# Altium PCB A313_6.PcbDoc (part 2 of 3)
Units mm, origin at the board's own origin, x right, y up, seen from the top; angles counter-clockwise.
Board outline 230.01 x 157.01 mm, 2 copper layers (Top Layer, Bottom Layer); 234 components, 195 nets, 1068 pads, 566 vias.
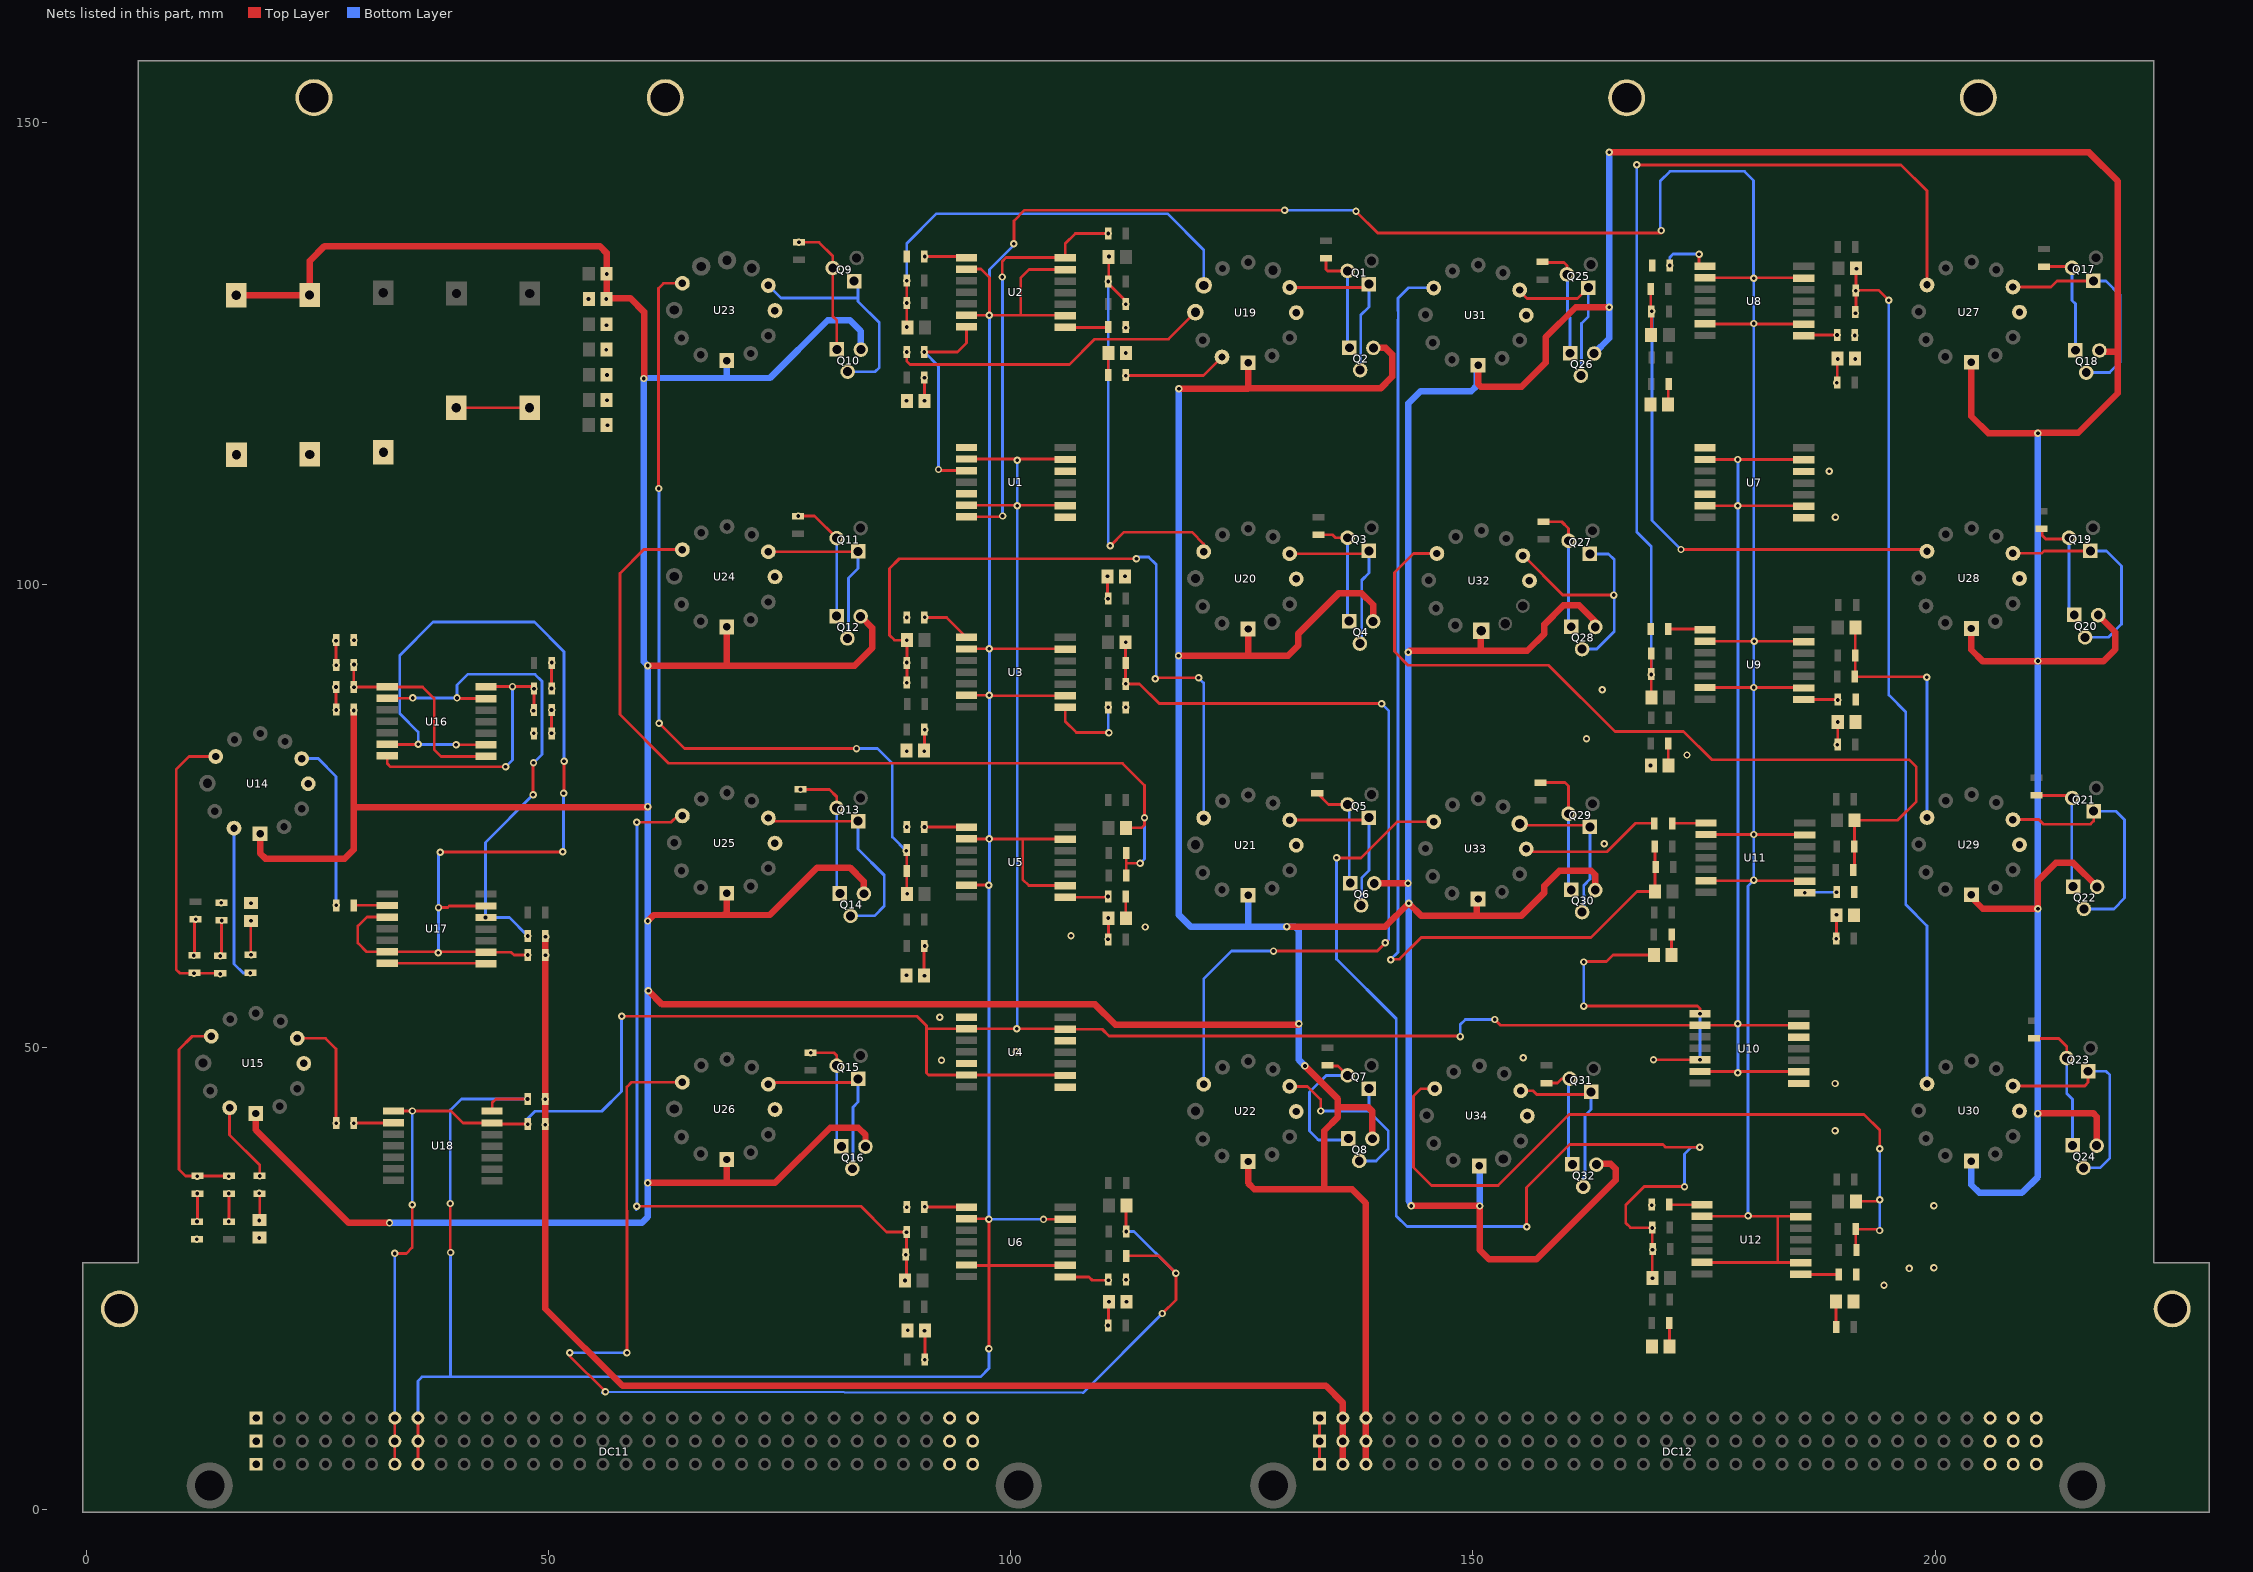
[diagram p2: the nets of this part, all layers, seen from the top]

## Via types
v1: diameter 0.8, hole 0.4, Top Layer to Bottom Layer, 566 vias

## Nets (pads, with @x,y where several pads share a name; then routed paths per layer and width w, separated by ;. In a path a pad name is that pad's centre, name@x,y a point inside that pad or via, vN(x,y) a via of type N, cw(c..) or ccw(c..) an arc to the next point about the centre after c; other vN are vias at no path point) (continued)
-12,6V: C40.2 C41.2 C42.2 C43.1 DC12.A3 DC12.B3 DC12.C3 pad.2 pad.5 Q2.3 Q4.3 Q6.3 Q8.3 Q10.3 Q12.3 Q14.3 Q16.3 Q18.3 Q20.3 Q22.3 Q24.3 Q26.3 Q28.3 Q30.3 Q32.3 R118.1 U14.1 U15.1 U19.1 U20.1 U21.1 U22.1 U23.1 U24.1 U25.1 U26.1 U27.1 U28.1 U29.1 U30.1 U31.1 U32.1 U33.1 U34.1 | length 1175.1
  Top Layer w0.3: Q18.3@217.75,125.35 219.6,125.35 219.725,125.225
  Top Layer w0.7: pad.2@16.25,131.325 pad.5@24.157,131.325 ; U15.1@18.35,42.835 18.35,41.05 28.4,31 v1(32.825,31) ; U14.1@18.825,73.085 18.825,70.975 19.4,70.4 27.975,70.4 28.949,71.374 28.949,75.975 ; pad.5@24.182,131.35 24.182,135.032 25.8,136.65 55.55,136.65 56.3,135.9 56.3,131.025 58.85,131.025 60.35,129.525 v1@60.35,122.325 ; R118.1@28.949,86.507 28.949,75.975 ; v1(60.75,35.325) 69.35,35.325 ; v1(60.75,63.65) 61.4,64.3 69,64.3 ; v1(60.75,91.275) 69.4,91.275 ; v1@60.8,75.975 28.949,75.975 ; v1(60.825,56.1) 62.3,54.625 109.125,54.625 111.3,52.45 v1@131.175,52.45 ; U26.1@69.3,37.86 69.3,35.375 69.35,35.325 ; U25.1@69.3,66.66 69.3,64.6 69,64.3 ; U24.1@69.3,95.46 69.3,91.375 69.4,91.275 ; Q12.3@83.775,96.6 85.025,95.35 85.025,93.175 83.125,91.275 69.4,91.275 ; Q14.3@84.125,66.6 84.125,67.925 82.625,69.425 79.075,69.425 73.95,64.3 69,64.3 ; Q16.3@84.3,39.25 84.3,40.526 83.526,41.3 80.476,41.3 74.501,35.325 69.35,35.325 ; v1(118.15,92.35) 125.675,92.35 ; v1(118.2,121.225) 125.625,121.225 125.65,121.25 ; U22.1@125.675,37.635 125.675,35.325 126.35,34.65 132.5,34.65 133.925,34.632 133.925,40.975 135.4,42.45 135.4,43.525 ; U20.1@125.675,95.235 125.675,92.35 ; U19.1@125.675,124.035 125.675,121.275 125.65,121.25 ; v1(129.85,63.05) 140.525,63.05 v1(143.05,65.575) 144.426,64.199 150.425,64.199 ; v1(131.825,47.975) 135.4,44.4 135.4,43.525 ; 133.927,34.632 136.918,34.632 138.4,33.15 DC12.C3@138.4,10.35 ; DC12.A3@138.4,4.9 DC12.C3@138.4,9.9 ; Q8.3@139.125,40.1 139.125,43.05 138.65,43.525 135.4,43.525 ; Q4.3@139.2,96.05 139.2,97.85 137.975,99.075 135.455,99.075 131.125,94.745 131.125,93.475 130,92.35 125.675,92.35 ; Q2.3@139.225,125.625 140.55,125.625 141.25,124.925 141.25,122.5 140,121.25 125.65,121.25 ; Q6.3@139.325,67.725 v1(142.975,67.725) ; v1(143,92.725) 143.15,92.875 150.85,92.875 ; v1(143.312,32.837) 150.625,32.837 v1@150.625,32.875 ; U33.1@150.425,66.235 150.425,64.199 ; U31.1@150.55,123.76 150.55,121.75 150.85,121.45 155.275,121.45 157.85,124.025 157.85,126.775 161.1,130.025 v1(164.75,130.025) ; v1(150.725,32.825) 150.713,32.837 150.713,28.087 151.75,27.05 156.85,27.05 165.425,35.625 165.425,36.85 164.9,37.375 163.425,37.375 Q32.3@163.35,37.3 ; U32.1@150.85,94.985 150.85,92.875 ; Q30.3@163.225,67 163.225,68.656 162.781,69.1 159.35,69.1 157.725,67.475 157.725,66.725 155.199,64.199 150.425,64.199 ; Q28.3@163.225,95.45 163.225,96.05 161.5,97.775 159.775,97.775 157.725,95.725 157.725,94.725 155.875,92.875 150.85,92.875 ; v1@164.9,146.775 216.625,146.775 219.725,143.675 219.725,125.225 ; U29.1@203.9,66.485 203.9,66.214 205.144,64.969 v1(211.1,64.969) 211.1,68 213.025,69.925 214.925,69.925 Q22.3@217.5,67.35 ; U28.1@203.9,95.285 203.9,92.975 205.15,91.725 210.8,91.725 218.175,91.725 219.475,93.025 219.475,94.875 Q20.3@217.625,96.725 ; U27.1@203.9,124.085 203.9,118.25 205.75,116.4 v1(211.1,116.4) ; v1(211.075,42.825) 211.125,42.875 217.06,42.875 217.45,42.485 Q24.3@217.45,39.35 ; v1@211.1,116.45 215.45,116.45 219.725,120.725 219.725,125.225 ; Q18.3@217.75,125.35 217.875,125.225 219.725,125.225
  Bottom Layer w0.3: U34.1@150.675,37.11 U34.1@150.675,37.16 U34.1@150.725,37.11
  Bottom Layer w0.7: v1(32.825,31) 60.1,31 60.75,31.65 v1(60.75,35.325) v1(60.75,63.65) v1(60.75,76.025) v1(60.75,91.275) 60.317,91.708 60.317,122.325 60.317,122.355 60.337,122.375 69.3,122.375 ; U23.1@69.3,124.26 69.3,122.375 ; Q10.3@83.8,125.45 83.8,127.45 82.625,128.625 80.215,128.625 73.965,122.375 69.3,122.375 ; v1(118.2,121.225) 118.2,92.35 118.2,64.3 119.45,63.05 v1(129.85,63.05) 130.725,63.05 131.175,62.6 v1(131.175,52.55) 131.175,48.625 v1(131.825,47.975) ; 125.675,63.4 U21.1@125.675,66.435 ; v1(143.312,32.837) 143.05,33.375 v1(143.05,65.575) 143.1,65.625 143,65.725 v1(143,92.725) 143,119.625 144.325,120.95 149.8,120.95 150.425,121.575 U31.1@150.425,123.785 ; U34.1@150.425,37.36 U34.1@150.675,37.11 ; v1(150.725,32.825) U34.1@150.725,37.11 ; Q26.3@163.1,125.025 164.75,126.675 v1(164.75,130.025) v1(164.75,146.8) ; U30.1@203.9,37.685 203.9,35.125 204.775,34.25 209.375,34.25 211.1,35.975 211.075,37 211.08,42.825 v1(211.1,64.969) ; v1(211.1,116.4) v1(211.1,91.775) v1@211.1,65.225 ; v1(211.1,64.969) v1@211.1,65.225 ; v1(211.1,64.969) v1@211.1,65.225
  other v1: 28.95,86.425 60.325,122.325 56.25,130.925 56.325,133.625
-23V: DC12.A2 DC12.B2 DC12.C2 R32.1 R33.1 R35.1 R36.1 | length 137.4
  Top Layer w0.7: R33.1@49.674,62.032 R32.1@49.674,59.957 R36.1@49.674,44.407 R35.1@49.674,41.682 49.674,21.726 58.025,13.375 134.1,13.375 135.9,11.575 DC12.A2@135.9,4.9
  other v1: 49.675,41.625 49.675,44.375 49.7,59.95 49.7,61.95
A: C2.1 C3.2 C4.2 C6.1 C8.1 C10.1 C12.1 C14.1 C16.1 C18.1 C20.1 C22.1 C24.1 C26.1 C28.1 C30.1 C32.1 C34.1 C35.1 C36.1 C37.1 C38.1 C39.2 C40.1 C42.1 C43.2 C44.2 C45.2 C46.2 DC11.A1 DC11.A31 DC11.A32 DC11.B1 DC11.B31 DC11.B32 DC11.C1 DC11.C31 DC11.C32 DC12.A1 DC12.A30 DC12.A31 DC12.A32 DC12.B1 DC12.B30 DC12.B31 DC12.B32 DC12.C1 DC12.C30 DC12.C31 DC12.C32 pad.0 pad.3 pad.4 pad.7 pad.9 pad.10 R4.1 R5.1 R6.1 R7.1 R8.1 R9.1 R10.1 R11.1 R12.1 R13.1 R14.1 R15.1 R16.1 R17.1 R18.1 R19.1 R117.1 R120.1 R121.2 R122.1 U1.1 U1.5 U1.8 U1.12 U4.1 U4.5 U4.8 U4.12 U7.1 U7.5 U7.8 U7.12 U10.1 U10.5 U10.8 U10.12 U14.4 U15.4 U17.7 U17.8 U19.4 U20.4 U21.4 U22.4 U23.4 U24.4 U25.4 U26.4 U27.4 U28.4 U29.4 U30.4 U31.4 U32.4 U33.4 U34.4 | length 77.2
  Top Layer w0.3: U17.7@32.575,59.076 U17.8@43.2,59.076 ; pad.9@40.043,119.15 pad.10@47.975,119.15 ; v1(88.725,119.9) C12.1@88.775,119.9 ; R9.1@112.451,66.307 112.451,63.974 C8.1@112.475,63.95 ; DC12.A1@133.4,4.9 DC12.C1@133.4,9.9 ; U33.4@155.757,71.446 156.052,71.15 164.525,71.15 167.593,74.218 R16.1@169.626,74.218 ; v1@161.9,59.125 162.05,59.275 164.45,59.275 165.15,59.975 C32.1@169.5,59.975 ; v1(161.975,54.45) 174.275,54.45 174.55,54.175 v1(174.55,53.626) ; v1(169.525,48.65) v1(174.55,48.65) U10.5@174.55,48.626
  Bottom Layer w0.3: v1(161.975,54.45) 161.989,54.464 v1(161.989,59.214) ; v1(174.55,48.65) v1(174.55,53.626)
  other v1: 88.875,19.375 112.525,22.475 194.45,24.25 112.474,24.857 197.175,26.075 199.85,26.15 11.975,29.225 18.75,29.375 88.75,32.7 199.85,32.85 169.318,32.925 189.159,40.952 189.159,46.077 92.525,48.575 155.45,48.875 100.625,49.525 92.325,53.25 88.725,57.775 106.525,62.05 114.55,63 17.85,65.575 14.625,65.625 164.2,72 88.75,73.825 169.2,80.475 173.15,81.6 88.75,82.025 162.275,83.35 48.425,83.95 112.45,86.775 163.975,88.675 28.975,94.025 88.75,96.475 112.375,100.925 189.2,107.3 188.525,112.3 56.4,117.25 56.35,119.975 56.35,122.697 191.35,124.425 112.45,125.075 56.275,125.425 191.3,126.975 112.45,127.825 56.3,128.075 54.35,130.925
M: DC11.A7 DC11.B7 DC11.C7 R35.2 U1.2 U1.6 U1.9 U1.13 U4.2 U4.6 U4.9 U4.13 U7.2 U7.6 U7.9 U7.13 U10.2 U10.6 U10.9 U10.13 U18.1 U18.13 | length 406.4
  Top Layer w0.3: U18.1@33.25,43.101 v1(35.3,43.101) 39.474,43.101 40.774,41.801 U18.13@43.925,41.801 44.044,41.682 v1(47.774,41.682) ; DC11.A7@33.4,4.9 DC11.B7@33.4,7.4 DC11.C7@33.4,9.9 ; v1(33.4,27.7) 34.65,27.7 35.275,28.325 v1(35.275,32.95) v1@35.275,33.125 ; v1(57.925,53.35) 89.875,53.35 90.909,52.316 90.909,47.216 91.134,46.991 U4.6@95.225,46.991 105.85,46.991 U4.9@105.9,46.941 ; 90.959,51.991 U4.2@95.225,51.991 105.85,51.991 U4.13@105.9,51.941 109.909,51.941 110.65,51.2 148.575,51.2 v1(148.625,51.15) ; U1.6@95.225,108.611 105.85,108.611 U1.9@105.9,108.561 ; U1.2@95.225,113.611 105.85,113.611 U1.13@105.9,113.561 ; v1(152.35,53) 152.974,52.376 U10.2@174.55,52.376 185.175,52.376 U10.13@185.225,52.326 ; U10.6@174.55,47.376 U10.9@185.175,47.376 ; U7.6@175.099,108.564 U7.9@185.724,108.564 ; U7.2@175.099,113.564 v1(178.65,113.564) 185.724,113.564 U7.13@185.774,113.514
  Bottom Layer w0.3: DC11.C7@33.4,9.9 v1(33.4,27.7) v1@33.425,27.725 ; v1(35.275,32.95) v1@35.275,43 ; v1(47.774,41.682) 47.774,42.295 48.554,43.075 55.775,43.075 57.925,45.225 v1(57.925,53.35) ; v1@57.975,53.35 v1@57.975,53.5 ; v1(100.675,52) 100.675,52.15 100.725,52.2 v1(100.725,108.575) v1(100.725,113.475) ; v1(148.625,51.15) 148.625,52.45 149.175,53 v1(152.35,53) ; v1(178.65,113.564) v1(178.65,108.575) v1(178.65,52.55) v1(178.65,47.25) v1@178.675,47.225
M_: DC11.A8 DC11.B8 DC11.C8 R36.2 U2.2 U2.6 U2.9 U2.13 U3.2 U3.6 U3.9 U3.13 U5.2 U5.6 U5.9 U5.13 U6.2 U6.6 U6.9 U6.13 U8.2 U8.6 U8.9 U8.13 U9.2 U9.6 U9.9 U9.13 U11.2 U11.6 U11.9 U11.13 U12.2 U12.6 U12.9 U12.13 U18.14 | length 622.3
  Top Layer w0.3: DC11.A8@35.9,4.9 DC11.B8@35.9,7.4 DC11.C8@35.9,9.9 ; v1(39.4,33.1) 39.4,27.825 v1(39.425,27.8) ; U18.14@43.925,43.101 43.925,44 44.332,44.407 R36.2@47.774,44.407 ; U6.6@95.225,26.451 95.275,26.401 97.65,26.401 ; U6.2@95.225,31.451 97.599,31.451 v1(97.65,31.4) 97.65,26.426 ; U5.6@95.225,67.531 v1(97.644,67.531) ; U5.2@95.225,72.531 97.669,72.531 v1(97.675,72.525) 105.856,72.525 U5.13@105.9,72.481 ; U3.6@95.225,88.071 v1(97.671,88.071) ; U3.2@95.225,93.071 95.254,93.1 v1(97.675,93.1) 105.821,93.1 U3.13@105.9,93.021 ; U2.6@95.225,129.151 v1(97.7,129.151) ; U2.2@95.225,134.151 96.774,134.151 97.7,133.225 v1(97.7,129.151) ; v1@97.675,17.375 v1(97.65,17.4) 97.65,26.401 ; v1@97.75,88.15 v1(97.671,88.071) ; v1(100.35,136.9) 100.35,139.375 101.5,140.525 v1(129.625,140.525) ; 101.3,72.5 101.3,68.15 101.969,67.481 U5.9@105.9,67.481 ; v1(103.55,31.375) 103.576,31.401 U6.13@105.9,31.401 ; U6.9@105.9,26.401 97.675,26.401 ; U3.9@105.9,88.021 97.721,88.021 v1(97.671,88.071) ; U2.9@105.9,129.101 105.85,129.151 101.1,129.151 ; U2.13@105.9,134.101 101.976,134.101 101.1,133.225 101.1,129.151 ; v1(137.35,140.4) 139.7,138.05 v1@170.4,138.05 ; U12.6@174.775,26.726 185.4,26.726 U12.9@185.45,26.676 ; U12.2@174.775,31.726 182.957,31.726 ; U9.6@175.099,88.902 185.724,88.902 U9.9@185.774,88.852 ; U9.2@175.099,93.902 v1(180.425,93.902) 185.724,93.902 U9.13@185.774,93.852 ; U8.6@175.099,128.226 185.724,128.226 U8.9@185.774,128.176 ; U8.2@175.099,133.226 185.724,133.226 U8.13@185.774,133.176 ; U11.6@175.2,68.001 185.825,68.001 U11.9@185.875,67.951 ; U11.2@175.2,73.001 v1(180.375,73.001) 185.825,73.001 U11.13@185.875,72.951 ; 182.957,26.794 182.957,31.726 ; U12.13@185.45,31.676 185.4,31.726 182.957,31.726 ; 97.65,26.401 97.65,26.426 ; 97.65,26.401 97.675,26.401 ; 97.65,26.426 97.675,26.401 ; v1(97.7,129.151) 101.1,129.151
  Bottom Layer w0.3: DC11.C8@35.9,9.9 35.9,13.9 36.35,14.35 39.425,14.35 ; v1(39.4,33.1) 39.4,43.2 40.6,44.4 v1(47.75,44.4) ; v1@39.425,27.975 v1(39.425,27.8) 39.425,14.35 ; v1(97.644,67.531) 97.644,31.456 v1@97.675,31.425 ; v1(97.65,17.4) 97.65,15.275 96.725,14.35 39.425,14.35 ; v1(97.65,31.4) 103.525,31.4 v1(103.55,31.375) ; v1@97.7,67.525 97.7,88.071 v1(97.7,129.151) 97.7,134.125 100.35,136.775 v1(100.35,136.9) ; v1(129.625,140.525) 137.225,140.525 v1(137.35,140.4) ; v1@170.55,138.325 170.25,138.625 170.25,143.675 171.3,144.725 179.375,144.725 180.35,143.75 v1@180.35,133.3 ; v1(179.75,31.775) 179.75,67.45 v1(180.375,68.075) ; v1(180.375,133.175) v1@180.375,132.85 ; v1@180.425,132.85 v1@180.375,132.85 ; v1@180.475,67.975 v1(180.375,68.075) ; v1(180.375,68.075) v1(180.375,73.001) v1(180.375,88.9) v1(180.375,128.275) v1@180.375,132.85
  other v1: 170.35,138.325
NetC1_1: C1.1 R85.2 R86.1 U19.9 | length 48
  Top Layer w0.3: v1(88.774,132.907) v1(88.774,130.493) v1(88.774,127.901) C1.1@88.825,127.85
  Bottom Layer w0.3: v1(88.774,132.907) 88.774,136.949 91.975,140.15 116.975,140.15 120.874,136.251 U19.9@120.874,132.392
NetC2_2: C2.2 R38.1 | length 2.5
  Top Layer w0.3: C2.2@110.55,125.325 110.55,122.844 R38.1@110.551,122.843
NetC3_1: C3.1 R27.2 | length 3.7
  Top Layer w0.3: R27.2@17.782,59.976 17.825,60.019 C3.1@17.825,63.675
  other v1: 17.85,60 17.85,63.675
NetC4_1: C4.1 R31.2 | length 2.7
  Top Layer w0.3: C4.1@18.786,31.342 R31.2@18.786,34.048
  other v1: 18.725,31.25 18.75,34.2
NetC5_1: C5.1 R87.2 R88.1 U20.9 | length 46.1
  Top Layer w0.3: C5.1@110.6,135.45 110.6,132.575 112.451,130.724 R87.2@112.451,130.393 ; v1(110.775,104.225) 112.25,105.7 119.6,105.7 120.874,104.426 U20.9@120.874,103.592
  Bottom Layer w0.3: 110.551,104.599 v1(110.551,132.818)
  other v1: 112.45,130.35 110.625,135.518
NetC6_2: C6.2 R41.1 | length 2.4
  Top Layer w0.3: v1(110.475,100.925) 110.475,98.594 R41.1@110.551,98.518
  other v1: 110.525,98.5
NetC7_1: C7.1 R89.2 R90.1 U21.9 | length 76.1
  Top Layer w0.3: R89.2@88.774,89.432 88.775,89.433 v1(88.775,94.025) 87.425,94.025 86.9,94.55 86.9,101.775 87.95,102.825 v1(113.6,102.825) ; v1@115.625,89.95 v1(120.325,89.95)
  Bottom Layer w0.3: v1@113.55,103.025 114.925,103.025 115.75,102.2 v1@115.75,89.8 ; v1(120.325,89.95) 120.874,89.401 U21.9@120.874,74.792
  other v1: 88.75,89.425 115.625,89.85 88.775,91.6
NetC8_2: C8.2 R44.1 | length 2.3
  Top Layer w0.3: R44.1@110.551,61.668 110.575,61.692 C8.2@110.575,63.95
  other v1: 110.525,61.675 110.55,63.975
NetC9_1: C9.1 R91.2 R92.1 U22.9 | length 92.6
  Top Layer w0.3: C9.1@112.425,93.8 112.425,89.319 v1(112.451,89.293) 113.934,89.293 116.068,87.159 v1(140.116,87.159) ; v1(128.425,60.4) 139.65,60.4 v1@140.762,61.513 ; v1@140.203,87.247 v1@140.325,87.125
  Bottom Layer w0.3: U22.9@120.874,45.992 120.874,57.399 123.875,60.4 v1(128.425,60.4) ; v1(140.116,87.159) 140.9,86.375 140.9,61.675 v1(140.525,61.3)
  other v1: 112.45,93.8
NetC10_2: C10.2 R47.1 | length 2.8
  Top Layer w0.3: R47.1@110.551,19.918 110.575,19.942 C10.2@110.575,22.725
  other v1: 110.525,19.9 110.625,22.475
NetC11_1: C11.1 R93.2 R94.1 U23.9 | length 91.8
  Top Layer w0.3: v1(61.925,110.425) 61.925,132.075 62.467,132.617 U23.9@64.499,132.617 ; v1(61.975,85.05) 64.725,82.3 v1(83.325,82.3) ; v1(88.7,71.25) 88.7,71.233 R93.2@88.774,71.307 88.774,71.25 88.774,66.576 C11.1@88.775,66.575
  Bottom Layer w0.3: v1(61.925,110.425) 61.975,110.375 v1(61.975,85.05) ; v1(83.325,82.3) 85.6,82.3 87.2,80.7 87.2,72.75 v1(88.7,71.25)
  other v1: 88.825,66.6
NetC12_2: C12.2 R50.1 | length 2.5
  Top Layer w0.3: v1(90.674,122.407) v1(90.674,119.901) C12.2@90.675,119.9
NetC13_1: C13.1 R95.2 R96.1 U24.9 | length 98.5
  Top Layer w0.3: U24.9@64.499,103.817 60.317,103.817 57.75,101.25 57.75,85.975 63.025,80.7 112.1,80.7 114.475,78.325 v1(114.475,74.825) 114.475,74.05 114.15,73.725 C13.1@112.5,73.725 ; R95.2@112.499,68.595 112.499,69.896 ; R96.1@112.499,71.007 112.499,69.896 ; v1@114.05,69.95 v1(113.996,69.896) 112.499,69.896
  Bottom Layer w0.3: v1(113.996,69.896) 114.475,70.375 v1(114.475,74.825)
NetC14_2: C14.2 R53.1 | length 2.6
  Top Layer w0.3: C14.2@90.625,82.075 90.674,82.124 R53.1@90.674,84.357 R53.1@90.674,84.607
  other v1: 90.65,82.025 90.7,84.35
NetC15_1: C15.1 R97.2 R98.1 U25.9 | length 82.8
  Top Layer w0.3: v1(59.575,32.8) 83.8,32.8 86.593,30.007 R97.2@88.749,30.007 88.749,24.949 v1(88.575,24.775) ; v1(59.575,74.325) 63.275,74.325 63.967,75.017 U25.9@64.499,75.017
  Bottom Layer w0.3: v1@59.5,32.45 59.575,32.525 v1(59.575,32.8) v1(59.575,74.325)
  other v1: 88.65,27.55 88.725,30
NetC16_2: C16.2 R56.1 | length 3.2
  Top Layer w0.3: C16.2@90.625,57.775 90.625,60.908 R56.1@90.674,60.957
  other v1: 90.675,57.725 90.7,60.957
NetC17_1: C17.1 R99.2 R100.1 U26.9 | length 131.9
  Top Layer w0.3: v1(52.3,16.95) 52.3,16.625 v1(56.175,12.75) ; v1(58.5,16.95) 58.5,32.331 58.49,32.341 58.49,45.715 58.992,46.217 U26.9@64.499,46.217 ; v1(112.492,30.075) R100.1@112.499,30.082 112.475,30.106 112.475,32.4 C17.1@112.499,32.376 ; R99.2@112.526,27.443 115.982,27.443 v1(117.875,25.55) 117.875,22.675 v1(116.4,21.2)
  Bottom Layer w0.3: v1@52.275,16.925 v1(52.3,16.95) v1(58.5,16.95) ; v1@55.85,12.625 v1(56.175,12.75) 107.825,12.625 v1(116.4,21.2) ; v1(112.492,30.075) 113.35,30.075 v1(117.875,25.55)
NetC18_2: C18.2 R59.1 | length 3.1
  Top Layer w0.3: R59.1@90.725,16.258 C18.2@90.725,19.375
  other v1: 90.725,16.2 90.675,19.325
NetC19_1: C19.1 R101.2 R102.1 U27.9 | length 103.3
  Top Layer w0.3: v1(167.7,145.425) 196.3,145.425 199.099,142.626 U27.9@199.099,132.442 ; R101.2@169.274,92.557 v1(169.274,90.3) 169.274,87.851 C19.1@169.3,87.825
  Bottom Layer w0.3: v1(167.7,145.425) 167.7,105.75 169.274,104.176 v1(169.274,90.3)
NetC20_2: C20.2 R62.1 | length 2.6
  Top Layer w0.3: R62.1@189.376,121.868 189.4,121.892 C20.2@189.4,124.5
  other v1: 189.35,121.85 189.451,124.425
NetC21_1: C21.1 R103.2 R104.1 U28.9 | length 58.8
  Top Layer w0.3: R103.2@169.224,131.982 169.224,129.62 R104.1@169.301,129.543 169.301,127.051 C21.1@169.275,127.025 ; v1(172.5,103.825) 198.916,103.825 U28.9@199.099,103.642
  Bottom Layer w0.3: v1(169.35,129.6) 169.35,106.975 v1(172.5,103.825)
NetC22_2: C22.2 R65.1 | length 2.4
  Top Layer w0.3: R65.1@189.45,82.767 v1(189.45,85.175)
  other v1: 189.4,82.725
NetC23_1: C23.1 R105.2 R106.1 U29.9 | length 28.4
  Top Layer w0.3: C23.1@191.35,95.4 191.35,90.142 191.276,90.068 R105.2@191.301,90.068 199.032,90.068 v1(199.075,90.025)
  Bottom Layer w0.3: v1(199.075,90.025) 199.099,90.001 U29.9@199.099,74.842
NetC24_2: C24.2 R68.1 | length 2.5
  Top Layer w0.3: R68.1@189.325,61.767 C24.2@189.325,64.275
  other v1: 189.275,61.725 189.324,64.325
NetC25_1: C25.1 R107.2 R108.1 U30.9 | length 95.3
  Top Layer w0.3: R107.2@191.326,129.493 191.425,129.592 191.425,131.806 R108.1@191.374,131.857 R108.1@191.425,131.857 ; C25.1@191.425,134.25 R108.1@191.425,131.857 ; v1(194.975,130.775) 193.893,131.857 R108.1@191.425,131.857
  Bottom Layer w0.3: v1(194.975,130.775) 194.975,88.075 196.8,86.25 196.8,65.425 199.099,63.126 U30.9@199.099,46.042
  other v1: 191.375,129.375 191.4,131.825 191.475,134.206
NetC26_2: C26.2 R71.1 | length 2.8
  Top Layer w0.3: C26.2@189.25,22.5 189.25,19.769 R71.1@189.276,19.743
NetC27_1: C27.1 R109.2 R110.1 U31.9 | length 112.8
  Top Layer w0.3: v1@140.825,59.525 142.05,59.525 144.4,61.875 162.75,61.875 167.725,66.85 C27.1@169.675,66.85 C27.1@169.675,66.85 R109.2@169.674,71.682
  Bottom Layer w0.3: v1(141.1,59.475) 141.9,60.275 141.9,128.691 141.91,128.701 141.91,129.599 141.9,129.609 141.9,131 143.042,132.142 U31.9@145.624,132.142
NetC28_2: C28.2 R74.1 | length 2.8
  Top Layer w0.3: C28.2@171.125,119.375 171.125,122.083 R74.1@171.199,122.157
NetC29_1: C29.1 R111.2 R112.1 U32.9 | length 92.3
  Top Layer w0.3: U32.9@146.099,103.392 143.567,103.392 141.5,101.325 141.5,92.8 143,91.3 158.2,91.3 165.35,84.15 172.775,84.15 175.825,81.1 197.175,81.1 197.95,80.325 197.95,76.575 195.925,74.55 C29.1@191.275,74.55 191.275,69.292 R111.2@191.151,69.168
NetC30_2: C30.2 R77.1 | length 2.3
  Top Layer w0.3: C30.2@171.124,80.501 R77.1@171.124,82.832
NetC31_1: C31.1 R113.2 R114.1 U33.9 | length 116.2
  Top Layer w0.3: v1(135.25,70.475) 137.9,70.475 141.817,74.392 U33.9@145.749,74.392 ; v1@155.8,30.6 155.8,34.825 160.45,39.475 170.55,39.475 170.85,39.175 v1(174.525,39.175) ; C31.1@169.425,25.05 169.399,25.076 R113.2@169.399,30.482 167.018,30.482 166.525,30.975 166.525,32.925 168.525,34.925 v1(172.875,34.925)
  Bottom Layer w0.3: v1(135.25,70.475) 135.25,59.525 141.7,53.075 141.7,31.75 142.85,30.6 v1(155.825,30.6) ; v1(172.875,34.925) 172.875,38.45 173.6,39.175 v1(174.525,39.175)
  other v1: 169.425,25.025 169.425,28.1 169.4,30.45
NetC32_2: C32.2 R80.1 | length 2.2
  Top Layer w0.3: R80.1@171.474,62.207 171.474,59.976 C32.2@171.475,59.975
NetC33_1: C33.1 R115.2 R116.1 U34.9 | length 83.7
  Top Layer w0.3: U34.9@145.874,45.517 144.367,45.517 143.575,44.725 143.575,37 145.525,35.05 152.725,35.05 160.4,42.725 192.3,42.725 194,41.025 v1(194,39.029) ; C33.1@191.275,33.35 v1@193.85,33.35 ; R115.2@191.4,28.26 191.4,30.307 193.843,30.307 v1(193.975,30.175)
  Bottom Layer w0.3: v1@193.929,39.1 v1(194,39.029) v1(194,33.5) 194,30.2 v1(193.975,30.175)
NetC34_2: C34.2 R83.1 | length 2.5
  Top Layer w0.3: R83.1@171.249,20.157 C34.2@171.25,17.625 C34.2@171.25,17.625
NetQ1_1: Q1.1 Q2.2 U19.5 | length 18.7
  Top Layer w0.3: U19.5@130.17,132.163 138.388,132.163 Q1.1@138.75,132.525
  Bottom Layer w0.3: Q2.2@137.798,123.232 137.862,123.297 137.862,129.187 138.75,130.075 Q1.1@138.75,132.525 Q1.1@138.925,132.35
NetQ1_3: Q1.3 Q2.1 R39.1 | length 11.9
  Top Layer w0.3: R39.1@134.107,135.326 134.107,134.118 134.273,133.952 Q1.3@136.436,133.952
  Bottom Layer w0.3: Q2.1@136.35,125.65 136.436,125.736 Q1.3@136.436,133.952
NetQ3_1: Q3.1 Q4.2 U20.5 | length 19.8
  Top Layer w0.3: U20.5@130.17,103.363 138.438,103.363 Q3.1@138.75,103.675
  Bottom Layer w0.3: Q4.2@137.773,93.657 137.975,93.86 137.975,95.525 137.963,95.537 137.963,96.575 137.975,96.587 137.975,100.5 138.75,101.275 Q3.1@138.75,103.675 Q3.1@139.2,103.225
NetQ3_3: Q3.3 Q4.1 R42.1 | length 12.8
  Top Layer w0.3: R42.1@133.282,105.426 134.817,105.426 135.14,105.102 Q3.3@136.436,105.102 Q3.3@136.113,105.426
  Bottom Layer w0.3: Q4.1@136.425,96.075 136.436,96.086 Q3.3@136.436,105.102
NetQ5_1: Q5.1 Q6.2 U21.5 | length 19.1
  Top Layer w0.3: U21.5@130.17,74.563 138.488,74.563 Q5.1@138.75,74.825
  Bottom Layer w0.3: Q6.2@137.898,65.332 137.962,65.397 137.962,68.312 138.75,69.1 Q5.1@138.75,74.825 Q5.1@139.175,74.4
NetQ5_3: Q5.3 Q6.1 R45.1 | length 12.3
  Top Layer w0.3: R45.1@133.157,77.476 134.381,76.252 Q5.3@136.436,76.252
  Bottom Layer w0.3: Q6.1@136.611,67.75 Q5.3@136.611,76.252
NetQ7_1: Q7.1 Q8.2 U22.5 | length 21.7
  Top Layer w0.3: U22.5@130.17,45.763 132.112,45.763 133.525,44.35 v1(133.525,43.1)
  Bottom Layer w0.3: U22.5@130.17,45.763 U22.5@130.332,45.925 ; v1(133.525,43.1) 138.7,43.1 ; Q8.2@137.698,37.707 139.532,37.707 140.825,39 140.825,40.975 138.7,43.1 ; Q7.1@138.75,45.525 138.75,43.15 138.7,43.1
NetQ7_3: Q7.3 Q8.1 R48.1 | length 16.4
  Top Layer w0.3: R48.1@134.132,47.976 135.413,47.976 Q7.3@136.436,46.952
  Bottom Layer w0.3: Q7.3@136.436,46.952 134.127,46.952 132.325,45.15 132.325,40.925 133.25,40 133.275,40 133.3,39.975 Q8.1@136.525,39.975
NetQ9_1: Q9.1 Q10.2 U23.5 | length 24.8
  Bottom Layer w0.3: U23.5@73.795,132.388 75.159,131.025 83.45,131.025 83.5,131.075 ; Q10.2@82.373,123.057 85.332,123.057 85.8,123.525 85.8,128.35 83.5,130.65 83.5,131.075 ; Q9.1@83.063,132.388 83.5,132.825 83.5,131.075
NetQ9_3: Q9.3 Q10.1 R51.1 | length 14.7
  Top Layer w0.3: v1(77.1,137.05) 79.275,137.05 80.755,135.57 Q9.3@80.755,134.273 80.755,129.045 81.2,128.6 Q10.1@81.2,125.475 ; Q9.3@81.09,134.156 Q9.3@81.186,134.252
NetQ11_1: Q11.1 Q12.2 U24.5 | length 19.7
  Top Layer w0.3: U24.5@73.795,103.588 83.463,103.588 Q11.1@83.5,103.625
  Bottom Layer w0.3: Q12.2@82.348,94.207 82.475,94.335 82.475,100.75 83.5,101.775 Q11.1@83.5,103.625 Q11.1@83.463,103.588
NetQ11_3: Q11.3 Q12.1 R54.1 | length 13.9
  Top Layer w0.3: R54.1@77.018,107.449 78.79,107.449 Q11.3@81.186,105.052 Q11.3@81.008,104.874
  Bottom Layer w0.3: Q12.1@81.186,96.575 Q11.3@81.186,105.052
  other v1: 77.025,107.45
NetQ13_1: Q13.1 Q14.2 U25.5 | length 24.5
  Top Layer w0.3: U25.5@73.795,74.788 74.134,74.45 Q13.1@83.5,74.45
  Bottom Layer w0.3: U25.5@73.795,74.788 U25.5@73.944,74.64 ; Q14.2@82.698,64.207 85.257,64.207 86.325,65.275 86.325,68.6 83.5,71.425 Q13.1@83.5,74.45
NetQ13_3: Q13.3 Q14.1 R57.1 | length 15.6
  Top Layer w0.3: v1(77.268,77.874) 80.401,77.874 81.186,77.089 Q13.3@81.186,75.877 Q13.3@80.79,76.274
  Bottom Layer w0.3: Q13.3@81.186,75.877 81.186,66.689 Q14.1@81.45,66.425
NetQ15_1: Q15.1 Q16.2 U26.5 | length 19.9
  Top Layer w0.3: U26.5@73.795,45.988 73.981,46.174 83.099,46.174 Q15.1@83.5,46.575
  Bottom Layer w0.3: Q16.2@82.873,36.857 82.937,36.922 82.937,43.512 83.5,44.075 Q15.1@83.5,46.575
NetQ15_3: Q15.3 Q16.1 R60.1 | length 13
  Top Layer w0.3: v1(78.368,49.399) 80.876,49.399 81.186,49.089 Q15.3@81.186,48.002
  Bottom Layer w0.3: Q15.3@81.186,48.002 81.186,39.789 Q16.1@81.7,39.275
NetQ17_1: Q17.1 Q18.2 U27.5 | length 24.7
  Top Layer w0.3: U27.5@208.395,132.213 U27.5@208.688,132.213 ; U27.5@208.4,131.925 U27.5@208.688,132.213 ; Q17.1@217.1,132.875 Q17.1@216.925,132.875 ; Q17.1@217.175,133.125 Q17.1@216.925,132.875 ; U27.5@208.688,132.213 212.513,132.213 213.175,132.875 Q17.1@216.925,132.875
  Bottom Layer w0.3: Q18.2@216.323,122.957 218.857,122.957 220,124.1 220,131.325 218.45,132.875 Q17.1@217.1,132.875
NetQ17_3: Q17.3 Q18.1 R124.1 | length 12.2
  Top Layer w0.3: R124.1@211.732,134.426 214.663,134.426 Q17.3@214.786,134.302
  Bottom Layer w0.3: Q17.3@214.786,134.302 214.786,130.775 215.15,130.411 Q18.1@215.15,125.375 ; Q17.3@214.836,134.302 Q17.3@214.836,134.327
NetQ19_1: Q19.1 Q20.2 U28.5 | length 23.4
  Top Layer w0.3: U28.5@208.395,103.413 211.482,103.413 211.744,103.675 Q19.1@216.775,103.675
  Bottom Layer w0.3: Q20.2@216.198,94.332 218.732,94.332 220.15,95.75 220.15,102.025 218.5,103.675 Q19.1@216.775,103.675
NetQ19_3: Q19.3 Q20.1 R66.1 | length 12.3
  Top Layer w0.3: R66.1@211.557,106.001 211.557,105.368 211.948,104.977 Q19.3@214.461,104.977
  Bottom Layer w0.3: Q19.3@214.461,105.102 214.461,97.314 Q20.1@215.025,96.75
NetQ21_1: Q21.1 Q22.2 U29.5 | length 27.8
  Top Layer w0.3: U29.5@208.395,74.613 211.187,74.613 211.675,74.125 216.8,74.125 217.125,74.45 Q21.1@217.125,75.525
  Bottom Layer w0.3: Q22.2@216.073,64.957 219.307,64.957 220.475,66.125 220.475,74.6 219.55,75.525 Q21.1@217.125,75.525 Q21.1@217.5,75.15
NetQ21_3: Q21.3 Q22.1 R69.1 | length 13.6
  Top Layer w0.3: R69.1@210.932,77.226 214.491,77.226 214.765,76.952 Q21.3@214.811,76.952
  Bottom Layer w0.3: Q22.1@214.765,67.375 214.765,76.906 Q21.3@214.811,76.952
NetQ23_1: Q23.1 Q24.2 U30.5 | length 24.3
  Top Layer w0.3: U30.5@208.395,45.813 216.163,45.813 216.525,46.175 Q23.1@216.525,47.4
  Bottom Layer w0.3: Q24.2@216.023,36.957 217.832,36.957 218.875,38 218.875,47 218.475,47.4 Q23.1@216.525,47.4
NetQ23_3: Q23.3 Q24.1 R72.1 | length 14.9
  Top Layer w0.3: R72.1@210.657,50.951 213.349,50.951 214.211,50.089 Q23.3@214.211,48.827
  Bottom Layer w0.3: Q23.3@214.211,48.827 214.211,45.014 214.85,44.375 Q24.1@214.85,39.375
NetQ25_1: Q25.1 Q26.2 U31.5 | length 18.3
  Top Layer w0.3: U31.5@154.92,131.913 155.859,130.975 161.3,130.975 Q25.1@162.475,132.15
  Bottom Layer w0.3: Q26.2@161.673,122.632 161.737,122.697 161.737,128.287 162.475,129.025 Q25.1@162.475,132.15
NetQ25_3: Q25.3 Q26.1 R75.1 | length 12.3
  Top Layer w0.3: R75.1@157.618,134.874 159.826,134.874 160.161,134.539 Q25.3@160.161,133.577
  Bottom Layer w0.3: Q25.3@160.161,133.577 160.225,133.514 160.225,129.2 160.5,128.925 Q26.1@160.5,125.05
NetQ27_1: Q27.1 Q28.2 U32.5 | length 27
  Top Layer w0.3: U32.5@155.395,103.163 U32.5@155.445,103.163 ; U32.5@155.962,103.163 U32.5@155.445,103.163 ; v1(165.225,98.9) 159.709,98.9 U32.5@155.445,103.163
  Bottom Layer w0.3: Q28.2@161.798,93.057 163.382,93.057 165.275,94.95 165.275,102.738 164.663,103.35 Q27.1@162.65,103.35
NetQ27_3: Q27.3 Q28.1 R78.1 | length 13.7
  Top Layer w0.3: R78.1@157.643,106.824 159.601,106.824 160.336,106.089 Q27.3@160.336,104.777
  Bottom Layer w0.3: Q27.3@160.336,104.777 160.336,95.764 Q28.1@160.625,95.475
NetQ29_1: Q29.1 Q30.2 U33.5 | length 17.6
  Top Layer w0.3: U33.5@155.045,74.163 155.194,74.015 162.46,74.015 Q29.1@162.65,73.825
  Bottom Layer w0.3: Q30.2@161.798,64.607 162,64.81 162,66.463 161.988,66.475 161.988,67.513 162.65,68.175 Q29.1@162.65,73.825 Q29.1@162.825,73.65
NetQ29_3: Q29.3 Q30.1 R81.1 | length 14.8
  Top Layer w0.3: R81.1@157.293,78.624 159.951,78.624 160.336,78.239 Q29.3@160.336,75.252
  Bottom Layer w0.3: Q29.3@160.336,75.152 160.326,67.351 160.638,67.038 Q30.1@160.875,66.8
NetQ31_1: Q31.1 Q32.2 U34.5 | length 18.5
  Top Layer w0.3: U34.5@155.17,45.288 156.512,45.288 156.9,44.9 162.5,44.9 Q31.1@162.775,45.175
  Bottom Layer w0.3: Q32.2@161.923,34.907 161.923,35.948 162.113,36.138 162.113,42.609 162.775,43.271 Q31.1@162.775,45.175
NetQ31_3: Q31.3 Q32.1 R84.1 | length 12.2
  Top Layer w0.3: R84.1@157.932,46.126 159.15,46.126 159.626,46.602 Q31.3@160.461,46.602
  Bottom Layer w0.3: Q31.3@160.336,46.602 160.336,37.739 Q32.1@160.75,37.325
NetR4_2: R4.2 U2.1 | length 4.6
  Top Layer w0.3: R4.2@90.674,135.518 v1(90.707,135.518) 95.108,135.518 U2.1@95.225,135.401
NetR5_2: R5.2 U2.8 | length 4.7
  Top Layer w0.3: U2.8@105.9,127.851 110.52,127.851 R5.2@110.551,127.882
NetR6_2: R6.2 U3.1 | length 5.4
  Top Layer w0.3: R6.2@90.674,96.468 93.078,96.468 U3.1@95.225,94.321
  other v1: 90.7,96.5
NetR7_2: R7.2 U3.8 | length 9.5
  Top Layer w0.3: U3.8@105.9,86.771 105.9,85.225 107.1,84.025 v1(110.625,84.025)
  Bottom Layer w0.3: v1(110.551,86.757) 110.551,84.099 v1(110.625,84.025)
NetR8_2: R8.2 U5.1 | length 4.6
  Top Layer w0.3: R8.2@90.674,73.818 95.188,73.818 U5.1@95.225,73.781
  other v1: 90.675,73.825
NetR9_2: R9.2 U5.8 | length 4.7
  Top Layer w0.3: U5.8@105.9,66.231 110.475,66.231 R9.2@110.551,66.307
  other v1: 110.525,66.3
NetR10_2: R10.2 U6.1 | length 4.6
  Top Layer w0.3: R10.2@90.674,32.718 95.208,32.718 U6.1@95.225,32.701
  other v1: 90.7,32.75
NetR11_2: R11.2 U6.8 | length 4.8
  Top Layer w0.3: U6.8@105.9,25.151 108.475,25.151 108.826,24.8 v1(110.575,24.8)
NetR12_2: R12.2 U9.1 | length 4
  Top Layer w0.3: R12.2@171.101,95.218 175.033,95.218 U9.1@175.099,95.152
NetR13_2: R13.2 U8.1 | length 6.1
  Top Layer w0.3: v1(174.45,135.775) 174.45,134.55 174.524,134.476 U8.1@175.099,134.476
  Bottom Layer w0.3: v1(171.276,134.543) 171.276,135.426 171.625,135.775 v1(174.45,135.775)
NetR14_2: R14.2 U9.8 | length 3.7
  Top Layer w0.3: U9.8@185.774,87.602 189.454,87.602 R14.2@189.474,87.582
  other v1: 189.461,87.55
NetR15_2: R15.2 U8.8 | length 3.6
  Top Layer w0.3: U8.8@185.774,126.926 185.88,127.032 R15.2@189.374,127.032
  other v1: 189.375,127.025
NetR16_2: R16.2 U11.1 | length 3.7
  Top Layer w0.3: R16.2@171.526,74.218 175.167,74.218 U11.1@175.2,74.251
NetR17_2: R17.2 U11.8 | length 3.5
  Bottom Layer w0.3: v1(185.875,66.701) 185.927,66.753 v1(189.309,66.753)
NetR18_2: R18.2 U12.1 | length 3.5
  Top Layer w0.3: R18.2@171.251,32.968 174.767,32.968 U12.1@174.775,32.976
NetR19_2: R19.2 U12.8 | length 3.8
  Top Layer w0.3: U12.8@185.45,25.426 189.243,25.426 R19.2@189.274,25.457
NetR20_1: R20.1 R63.2 | length 4
  Top Layer w0.3: R20.1@11.718,59.949 11.718,63.724 R63.2@11.843,63.849
  other v1: 11.65,59.925 11.875,63.85
NetR20_2: R20.2 R21.2 U14.9 | length 31.4
  Top Layer w0.3: U14.9@14.024,81.442 11.142,81.442 9.75,80.05 9.75,58.4 10.151,57.999 R21.2@14.518,57.999
  other v1: 14.525,57.925 11.675,58
NetR21_1: R21.1 R117.2 | length 3.9
  Top Layer w0.3: R21.1@14.518,59.899 14.643,60.024 R117.2@14.643,63.724
  other v1: 14.525,59.875 14.675,63.7
NetR22_1: R22.1 R118.2 | length 2.5
  Top Layer w0.3: R118.2@27.049,86.507 R22.1@27.049,88.968
  other v1: 27.05,86.475 27.025,88.95
NetR22_2: R22.2 R23.2 U16.1 U16.8 | length 23
  Top Layer w0.3: R23.2@28.949,91.343 R22.2@28.949,88.968 36.407,88.968 37.65,87.725 37.65,82.2 38.399,81.451 U16.8@43.25,81.451
  other v1: 28.975,88.925 28.975,91.4
NetR23_1: R23.1 R122.2 | length 2.7
  Top Layer w0.3: R23.1@27.049,91.343 R122.2@27.049,94.032
  other v1: 27.05,91.325 27.025,93.975
NetR24_1: R24.1 R119.2 | length 3
  Top Layer w0.3: v1(15.452,31.15) v1(15.452,34.175)
NetR24_2: R24.2 R25.2 U15.9 | length 25.9
  Top Layer w0.3: v1(12.025,36.05) R24.2@15.15,36.05 ; U15.9@13.549,51.192 11.492,51.192 10.05,49.75 10.05,36.775 10.75,36.075 R25.2@12.05,36.075 15.125,36.075 R24.2@15.15,36.05 ; v1(15.45,36.05) R24.2@15.15,36.05
NetR25_1: R25.1 R120.2 | length 3
  Top Layer w0.3: R120.2@12.05,31.2 R25.1@12.05,34.175
  other v1: 12,31.15 12.025,34.175
NetR26_1: R26.1 U14.5 | length 18.6
  Bottom Layer w0.3: U14.5@23.32,81.213 25.112,81.213 27.049,79.276 v1(27.049,65.343) 27.049,65.324 v1@26.95,65.225
NetR26_2: R26.2 U17.2 | length 3.6
  Top Layer w0.3: R26.2@28.949,65.343 32.558,65.343 U17.2@32.575,65.326
NetR27_1: R27.1 U14.12 | length 16.8
  Bottom Layer w0.3: U14.12@16.005,73.695 16.005,59.02 17,58.025 v1(17.75,58.025)
NetR28_1: R28.1 R29.1 U16.7 U16.14 | length 30.6
  Top Layer w0.3: U16.7@32.575,81.501 32.575,80.675 32.925,80.325 v1(45.375,80.325) ; U16.14@43.25,89.001 v1(46.125,89.001) R28.1@48.266,89.001 ; R28.1@48.216,89.051 R28.1@48.266,89.001 ; R29.1@48.449,86.493 R28.1@48.449,88.818 R28.1@48.266,89.001 ; R28.1@48.449,89.001 R28.1@48.266,89.001
  Bottom Layer w0.3: v1(45.375,80.325) 46.125,81.075 46.125,88.925 v1@46.05,89
  other v1: 48.4,86.4 48.45,88.775
NetR28_2: R28.2 R123.1 | length 2.7
  Top Layer w0.3: R28.2@50.349,88.818 R123.1@50.349,91.557
  other v1: 50.35,88.8 50.375,91.6
NetR29_2: R29.2 R121.1 | length 2.6
  Top Layer w0.3: R121.1@50.349,83.932 R29.2@50.349,86.493
  other v1: 50.35,83.95 50.35,86.475
NetR30_1: R30.1 U15.5 | length 12.7
  Top Layer w0.3: U15.5@22.845,50.963 25.912,50.963 27.049,49.826 R30.1@27.049,41.793
  other v1: 27.075,41.775
NetR30_2: R30.2 U18.2 | length 4.3
  Top Layer w0.3: R30.2@28.949,41.793 33.192,41.793 U18.2@33.25,41.851
  other v1: 28.95,41.775
NetR31_1: R31.1 U15.12 | length 8.8
  Top Layer w0.3: U15.12@15.53,43.445 15.53,40.52 18.786,37.264 R31.1@18.786,35.948
  other v1: 18.786,36.075
NetR32_2: R32.2 U16.6 U16.9 U17.3 U17.6 U17.9 U17.13 | length 117.5
  Top Layer w0.3: U17.3@32.575,64.076 30.376,64.076 29.4,63.1 29.4,61.275 30.349,60.326 U17.6@32.575,60.326 U17.9@43.2,60.326 ; U16.6@32.575,82.751 v1(35.924,82.751) v1@35.95,82.725 ; v1(38.125,65.1) 39.114,65.1 39.29,65.276 U17.13@43.25,65.276 ; v1@38.3,65.25 v1@38.326,65.276 ; v1(38.325,71.1) 51.55,71.1 v1(51.575,71.125) ; v1@39.85,82.875 v1(40.024,82.701) U16.9@43.25,82.701 ; U17.9@43.25,60.276 45.975,60.276 46.276,59.975 v1(47.775,59.975) ; v1@51.7,77.7 v1(51.7,80.925)
  Bottom Layer w0.3: v1@38.1,60.525 v1(38.1,60.225) 38.125,60.25 v1(38.125,65.1) 38.125,70.9 v1(38.325,71.1) ; v1(40.024,82.701) 39.974,82.751 v1(35.924,82.751) 35.924,84.076 33.925,86.075 33.925,92.375 37.525,95.975 48.5,95.975 51.7,92.775 v1(51.7,80.925) ; v1(51.575,71.125) 51.65,71.2 v1(51.65,77.475)
NetR33_2: R33.2 U16.2 U16.13 U17.12 | length 55.8
  Top Layer w0.3: U16.2@32.575,87.751 35.326,87.751 v1(35.35,87.775) ; v1@40.325,87.7 40.326,87.701 U16.13@43.25,87.701 ; v1@48.35,80.875 v1(48.35,77.3) v1@48.525,77.125
  Bottom Layer w0.3: v1(35.35,87.775) v1(40.125,87.775) ; v1@40.2,87.85 v1(40.125,87.775) ; v1(47.774,62.032) 45.781,64.025 v1(43.2,64.025) 43.2,72.15 v1(48.35,77.3) ; v1@48.35,80.975 48.625,80.975 49.325,81.675 49.325,89.575 48.575,90.325 41.275,90.325 40.125,89.175 v1(40.125,87.775)
  other v1: 48.4,80.775
NetR37_1: R37.1 U1.3 U2.7 | length 23.1
  Top Layer w0.3: v1(90.668,125.182) R37.1@90.674,125.182 94.232,125.182 95.225,126.175 U2.7@95.225,127.901 ; v1(92.2,112.475) 92.314,112.361 U1.3@95.225,112.361
  Bottom Layer w0.3: v1(90.668,125.182) 92.2,123.65 v1(92.2,112.475)
NetR37_2: R37.2 U19.10 | length 34.7
  Top Layer w0.3: v1(88.774,125.182) 88.774,124.176 89.125,123.825 106.35,123.825 109.1,126.575 117.064,126.575 U19.10@119.985,129.496
NetR38_2: R38.2 U19.12 | length 11.2
  Top Layer w0.3: R38.2@112.451,122.65 120.86,122.65 U19.12@122.855,124.645
  other v1: 112.45,122.625
NetR40_1: R40.1 U1.7 U2.14 | length 45.1
  Top Layer w0.3: U1.7@95.225,107.361 v1@99.125,107.361 ; v1(99.1,133.3) 99.1,135 99.501,135.401 U2.14@105.9,135.401 105.9,136.925 106.993,138.018 R40.1@110.551,138.018
  Bottom Layer w0.3: v1(99.125,107.45) v1@99.125,133.4
  other v1: 110.55,138